# Altium PCB AVP32F08_EVM_Rev1.1.PcbDoc (part 2 of 2)
Units mm, origin at the board's own origin, x right, y up, seen from the top; angles counter-clockwise.
Board outline 120.23 x 75.25 mm, 4 copper layers (Top Layer, GND, S1, Bottom Layer), stack 2.642 mm thick; 139 components, 118 nets, 534 pads, 235 vias.
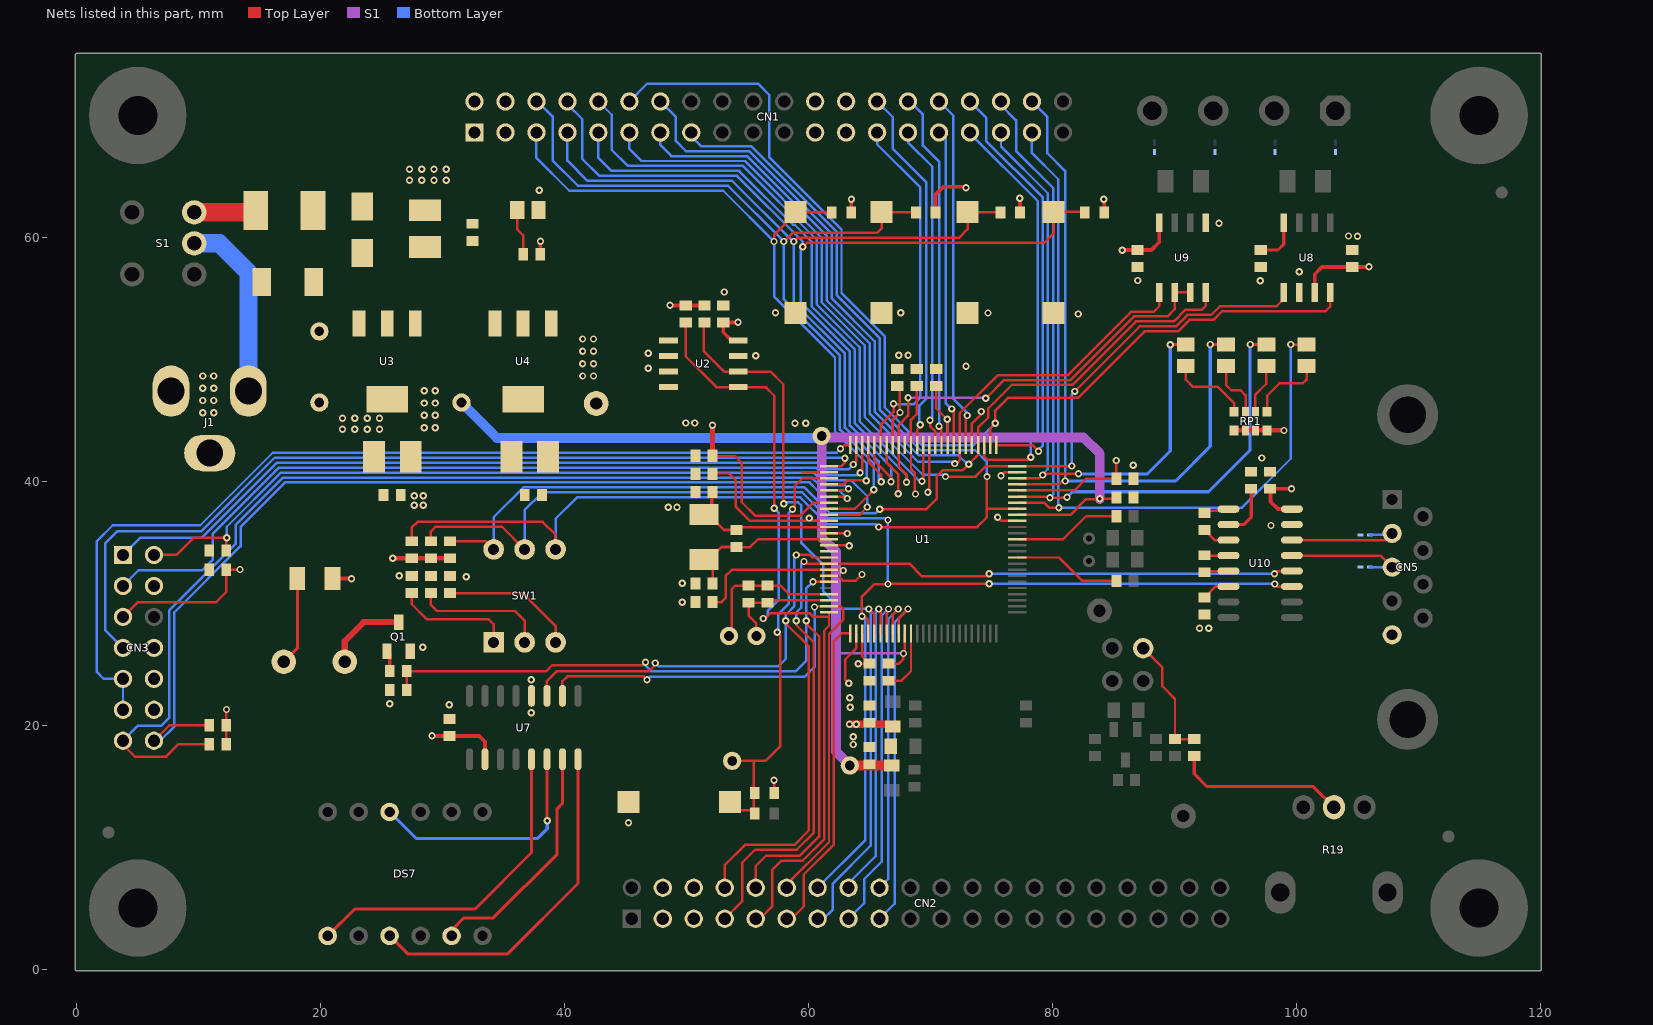
[diagram p4: the nets of this part, all layers, seen from the top]

## Via types
v1: diameter 0.6, hole 0.3, Top Layer to Bottom Layer, tented both sides, 235 vias

## Nets (pads, with @x,y where several pads share a name; then routed paths per layer and width w, separated by ;. In a path a pad name is that pad's centre, name@x,y a point inside that pad or via, vN(x,y) a via of type N, cw(c..) or ccw(c..) an arc to the next point about the centre after c; other vN are vias at no path point) (continued)
DGND: C1.2 C2.2 C3.1 C4.2 C7.2 C8.2 C9.2 C10.2 C11.2 C12.2 C13.2 C14.2 C16.2 C17.2 C18.2 C19.2 C20.2 C21.2 C22.2 C23.2 C30.2 C33.2 C39.2 C41.2 C42.2 C43.2 C44.2 C45.2 CN1.3 CN1.4 CN1.25 CN1.26 CN2.5 CN2.6 CN3.4 CN3.8 CN3.10 CN3.12 CN5.5 D2.1 DS2.2 J1.2 J1.3 K1.2 K2.2 K3.2 K4.2 K5.2 L3.1 Q1.S R4.1 R15.2 R23.1 R26.2 R27.2 R29.2 T1.2 T2.2 T3.2 T4.2 T5.2 T6.2 TP6.1 U1.2 U1.11 U1.41 U1.49 U1.55 U1.62 U1.69 U1.77 U1.87 U1.89 U1.94 U2.1 U2.2 U2.3 U2.4 U2.7 U3.1 U4.1 U7.4 U8.2 U9.5 U10.15 | length 32.8
  Top Layer w0.203: 59.53,40.749 U1.77@61.687,40.749 ; U1.94@61.687,32.249 62.442,32.249 62.84,31.852 63.881,31.852 v1(64.389,32.36) ; U1.89@61.687,34.749 63.32,34.749 v1(63.348,34.722) ; U1.87@61.687,35.749 63.158,35.749 v1(63.195,35.712) ; v1(63.297,23.444) 63.017,23.724 63.017,25.4 63.912,26.295 U1.2@63.912,27.524 ; U1.69@66.412,42.974 66.412,41.539 67.356,40.595 67.356,38.993 v1(67.361,38.989) ; C19.2@66.573,23.647 67.64,23.647 68.412,24.419 U1.11@68.412,27.524 ; v1(69.799,39.091) 69.912,39.204 U1.62@69.912,42.974 ; U1.55@73.412,42.974 73.412,44.736 74.168,45.491 v1(74.168,45.72) ; v1(75.514,37.059) 75.823,36.749 U1.41@77.137,36.749 ; v1(75.794,40.462) 76.081,40.749 U1.49@77.137,40.749
  other v1: 45.237,11.989 63.678,18.415 63.678,19.05 37.262,21.006 63.424,21.463 30.531,21.666 25.654,21.768 63.398,22.25 37.262,23.724 28.372,26.391 92.075,27.94 92.837,27.94 49.657,30.074 49.657,31.648 31.928,32.182 26.441,32.258 97.942,36.373 48.514,37.871 49.225,37.871 27.661,38.024 28.423,38.024 27.661,38.811 28.423,38.811 86.639,41.326 97.18,41.91 28.499,44.399 29.388,44.399 58.903,44.755 59.792,44.755 49.936,44.78 50.673,44.78 28.499,45.407 29.388,45.407 10.338,45.618 11.227,45.618 28.499,46.414 29.388,46.414 10.338,46.626 11.227,46.626 28.499,47.422 29.388,47.422 10.338,47.633 11.227,47.633 10.338,48.641 11.227,48.641 41.478,48.641 42.367,48.641 46.863,49.276 72.923,49.428 41.478,49.649 42.367,49.649 55.677,50.292 67.412,50.343 68.174,50.343 46.863,50.495 41.478,50.656 42.367,50.656 41.478,51.664 42.367,51.664 82.118,53.721 74.727,53.797 57.302,53.823 67.564,53.823 53.086,55.524 97.053,56.439 87.02,56.464 100.254,57.175 105.029,60.096 104.292,60.122 93.675,61.163 37.922,63.881 27.28,64.694 28.287,64.694 29.295,64.694 30.302,64.694 27.28,65.583 28.287,65.583 29.295,65.583 30.302,65.583
DP: DS7.dp U7.16 | length 28.6
  Top Layer w0.254: DS7.dp@25.654,2.718 27.127,1.245 35.331,1.245 41.097,7.01 U7.16@41.097,17.203
DSP_R\S\T\: C5.1 K1.1 R7.2 TP1.1 U1.78 | length 36.4
  Top Layer w0.203: K1.1@53.553,13.691 54.239,13.005 55.334,13.005 C5.1@55.588,12.751 55.499,12.84 R7.2@55.499,14.427 ; TP1.1@53.746,17.069 55.499,17.069 ; R7.2@55.588,14.427 R7.2@55.499,14.427 ; v1(57.455,27.61) 57.679,27.386 57.679,18.258 56.49,17.069 55.499,17.069 ; v1(58.699,37.719) 58.872,37.892 58.872,39.594 59.528,40.249 U1.78@61.687,40.249 ; R7.2@55.499,14.427 55.499,17.069
  Bottom Layer w0.203: v1(57.455,27.61) 57.531,27.686 57.531,29.108 58.395,29.972 58.395,37.414 v1(58.699,37.719)
DSP_RX_IN: CN5.3 T5.1 U10.13 | length 10.4
  Top Layer w0.203: U10.13@99.653,33.909 106.921,33.909 CN5.3@107.874,32.956
  Bottom Layer w0.203: T5.1@106.045,32.969 107.861,32.969 CN5.3@107.874,32.956
DSP_TX_OUT: CN5.2 T6.1 U10.14 | length 10.3
  Top Layer w0.203: U10.14@99.653,35.179 107.323,35.179 CN5.2@107.874,35.729
  Bottom Layer w0.203: T6.1@106.045,35.611 107.755,35.611 CN5.2@107.874,35.729
DVDD1V8: C16.1 C17.1 C18.1 C19.1 C20.1 C21.1 C22.1 C23.1 C33.1 L2.1 pad.2 TP4.1 U1.10 U1.42 U1.59 U1.68 U1.85 U1.93 U4.2 | length 148.6
  Top Layer w0.2: C19.1@66.573,25.047 67.415,25.047 67.793,25.425 v1(67.793,25.883)
  Top Layer w0.203: C23.1@52.07,40.594 52.116,40.64 53.492,40.64 54.026,40.107 54.026,37.948 55.224,36.749 59.838,36.749 v1(60.071,36.982) 60.304,36.749 U1.85@61.687,36.749 ; C20.1@52.135,30.099 52.883,30.099 53.213,30.429 53.213,32.233 53.73,32.749 U1.93@61.687,32.749 62.805,32.749 v1(62.865,32.69) ; U1.68@66.912,42.974 66.912,45.052 v1(67.508,45.648) 67.508,47.59 C22.1@67.285,47.814 ; v1(67.793,25.883) 67.912,26.002 U1.10@67.912,27.524 ; C21.1@70.485,47.814 70.485,45.974 v1(71.374,45.085) 71.412,45.047 U1.59@71.412,42.974 ; U1.42@77.137,37.249 81.496,37.249 82.779,38.532 83.871,38.532 v1(83.896,38.557) 85.153,38.557 C18.1@85.265,38.669
  Top Layer w0.8: pad.2@63.398,16.688 L2.1@66.853,16.688
  S1 w0.2: 62.256,25.883 v1(67.793,25.883)
  S1 w0.203: v1(60.071,36.982) 60.274,36.779 61.087,36.779 ; 62.256,32.715 62.282,32.69 v1(62.865,32.69) ; 66.929,43.601 66.929,45.069 v1(67.508,45.648) ; 71.374,43.601 v1(71.374,45.085)
  S1 w0.8: pad.2@63.398,16.688 62.256,17.83 62.256,25.883 62.256,32.715 62.256,34.238 61.087,35.408 61.087,36.779 pad.2@61.087,43.713 61.2,43.601 66.929,43.601 71.374,43.601 82.561,43.601 83.896,42.266 v1(83.896,38.557)
  Bottom Layer w0.8: TP4.1@31.547,46.457 34.442,43.561 60.655,43.561 pad.2@61.087,43.713
DVDD3V3: C1.1 C4.1 C7.1 C8.1 C11.1 C12.1 C13.1 C14.1 C30.1 C39.1 C41.1 C42.1 C43.1 CN1.1 CN1.2 CN1.23 CN1.24 CN2.3 CN2.4 CN3.5 L1.1 R1.2 R2.2 R5.1 R6.1 R7.1 R9.1 R12.1 R16.1 R17.1 R20.1 R21.1 R25.1 R28.1 R30.1 RP1.1 RP1.2 RP1.3 RP1.4 TP3.1 U1.3 U1.46 U1.65 U1.82 U2.8 U3.2 U7.10 U8.3 U9.8 U10.16 | length 106.9
  Top Layer w0.203: CN3.5@3.785,28.88 5.004,30.099 11.43,30.099 12.257,30.926 C4.1@12.257,32.741 13.36,32.741 v1(13.386,32.766) ; R5.1@12.257,18.44 R6.1@12.257,19.99 12.257,21.274 v1(12.268,21.285) ; C14.1@52.07,42.067 53.97,42.067 54.534,41.504 54.534,38.278 55.621,37.19 59.365,37.19 60.424,38.249 U1.82@61.687,38.249 ; v1(57.175,15.494) 57.188,15.481 R7.1@57.188,14.427 ; v1(64.084,25.044) 63.887,25.044 63.884,25.047 C12.1@64.999,25.047 64.412,25.634 U1.3@64.412,27.524 ; v1(68.783,38.964) 68.732,38.964 68.732,40.691 68.412,41.011 U1.65@68.412,42.974 68.407,42.98 68.407,45.039 68.885,45.517 C13.1@68.885,47.814 ; U1.46@77.137,39.249 81.82,39.249 82.779,40.208 C11.1@85.265,40.208 85.265,41.684 v1(85.242,41.707)
  Top Layer w0.305: R12.1@20.98,32.029 22.504,32.029 v1(22.53,32.004) ; v1(29.134,19.126) 29.148,19.112 C39.1@30.556,19.112 33.009,19.112 33.477,18.644 U7.10@33.477,17.203 ; R9.1@38.013,58.623 38.013,59.679 v1(38.024,59.69) ; v1(48.641,54.432) 48.652,54.421 R2.2@49.936,54.421 R1.2@51.473,54.421 ; v1(54.229,53.035) 54.215,53.021 C1.1@53.01,53.021 53.01,52.222 53.696,51.537 U2.8@54.242,51.537 ; R16.1@63.513,62.052 63.513,63.132 v1(63.525,63.144) ; R17.1@70.43,62.052 70.43,63.521 71.069,64.16 72.847,64.16 v1(72.923,64.084) ; v1(77.343,63.221) 77.347,63.216 R20.1@77.347,62.052 ; v1(84.226,63.119) 84.264,63.081 R21.1@84.264,62.052 ; v1(85.75,58.953) 85.765,58.968 C41.1@86.995,58.968 88.127,58.968 88.773,59.614 U9.8@88.773,61.201 ; C43.1@97.866,39.381 C43.1@97.892,39.381 ; v1(99.619,39.395) 99.604,39.381 C43.1@97.892,39.381 ; U10.16@99.653,37.719 98.501,37.719 97.892,38.328 C43.1@97.892,39.381 ; U8.3@101.524,55.486 101.524,56.972 102.119,57.568 C42.1@104.597,57.568 105.929,57.568 v1(105.969,57.607)
  Top Layer w0.381: v1(25.908,33.68) 25.913,33.685 R30.1@27.462,33.685 R25.1@30.612,33.685 ; C14.1@52.135,42.088 v1(52.135,44.591) ; RP1.1@94.912,44.173 99.007,44.173 v1(99.009,44.171)
  Top Layer w0.6: v1(63.373,20.066) 66.675,20.066 66.7,20.091 L1.1@66.904,19.888
  other v1: 63.932,20.066 21.793,44.272 22.801,44.272 23.808,44.272 24.816,44.272 21.793,45.161 22.801,45.161 23.808,45.161 24.816,45.161
E: DS7.e U7.13 | length 27.2
  Top Layer w0.254: DS7.e@20.574,2.718 22.784,4.928 32.664,4.928 37.287,9.55 U7.13@37.287,17.203
EMU0: CN3.13 R5.2 U1.80 | length 84.8
  Top Layer w0.203: CN3.13@3.785,18.72 3.785,18.39 4.75,17.424 7.315,17.424 8.331,18.44 R5.2@10.857,18.44 ; U1.80@61.687,39.249 63.152,39.249 v1(63.288,39.386)
  Bottom Layer w0.203: CN3.13@3.785,18.72 5.029,19.964 6.934,19.964 7.595,20.625 7.595,29.439 13.021,34.865 13.021,36.424 16.907,40.31 60.258,40.31 60.893,39.675 62.999,39.675 v1(63.288,39.386)
EMU1: CN3.14 R6.2 U1.81 | length 79.2
  Top Layer w0.203: CN3.14@6.325,18.72 7.595,19.99 R6.2@10.857,19.99 ; U1.81@61.687,38.749 63.028,38.749 v1(63.195,38.583)
  Bottom Layer w0.203: CN3.14@6.325,18.72 6.833,18.72 8.001,19.888 8.001,29.261 13.427,34.687 13.427,36.255 17.075,39.903 60.09,39.903 60.725,39.268 62.509,39.268 v1(63.195,38.583)
EPWM1A/LED2: CN1.38 DS4.2 U1.47 | length 59
  Top Layer w0.203: U1.47@77.137,39.749 80.542,39.749 80.823,40.03 v1(81.051,40.03)
  Top Layer w0.254: v1(92.954,51.225) 92.968,51.211 DS4.2@94.249,51.211
  Bottom Layer w0.203: CN1.38@78.334,71.152 79.604,69.882 79.604,66.904 81.051,65.456 v1(81.051,40.03)
  Bottom Layer w0.254: v1(81.051,40.03) 90.119,40.03 92.954,42.865 v1(92.954,51.225)
EPWM1B/LED4: CN1.37 DS6.2 U1.44 | length 66.7
  Top Layer w0.203: U1.44@77.137,38.249 79.327,38.249 79.756,37.821 v1(80.543,37.821) ; v1(99.558,51.225) 99.572,51.211 DS6.2@100.853,51.211
  Bottom Layer w0.203: CN1.37@78.334,68.612 78.334,66.929 80.493,64.77 80.493,37.871 v1(80.543,37.821) 95.529,37.821 99.558,41.849 v1(99.558,51.225)
EPWM2A/LED3: CN1.36 DS5.2 U1.45 | length 65.1
  Top Layer w0.203: U1.45@77.137,38.749 79.716,38.749 v1(79.807,38.659) 81.178,38.659 v1(81.204,38.684)
  Top Layer w0.254: v1(96.23,51.225) 96.244,51.211 DS5.2@97.551,51.211
  Bottom Layer w0.203: CN1.36@75.794,71.152 75.794,70.841 77.038,69.596 77.038,67.081 80.086,64.033 80.086,38.938 v1(79.807,38.659)
  Bottom Layer w0.254: v1(81.204,38.684) 81.661,39.141 92.812,39.141 96.23,42.56 v1(96.23,51.225)
EPWM2B/LED1: CN1.35 DS3.2 U1.48 | length 53.3
  Top Layer w0.203: U1.48@77.137,40.249 78.959,40.249 v1(79.223,40.513) 79.324,40.615 v1(82.144,40.615)
  Top Layer w0.254: v1(89.677,51.199) 89.689,51.211 DS3.2@90.947,51.211
  Bottom Layer w0.203: CN1.35@75.794,68.612 75.794,67.462 79.629,63.627 79.629,40.986 79.223,40.58 v1(79.223,40.513)
  Bottom Layer w0.254: v1(82.144,40.615) 87.808,40.615 89.677,42.484 v1(89.677,51.199)
EPWM3A: CN1.34 U1.51 | length 35
  Top Layer w0.203: U1.51@75.412,42.974 78.361,42.974 v1(78.867,42.469)
  Bottom Layer w0.203: CN1.34@73.254,71.152 74.574,69.831 74.574,67.92 79.223,63.271 79.223,42.951 78.867,42.596 v1(78.867,42.469)
EPWM3B: CN1.33 U1.53 | length 34.1
  Top Layer w0.203: U1.53@74.412,42.974 74.412,42.047 74.676,41.783 78.054,41.783 v1(78.232,41.961)
  Bottom Layer w0.203: CN1.33@73.254,68.612 73.254,68.529 78.816,62.967 78.816,43.79 78.232,43.205 v1(78.232,41.961)
EPWM4A: CN1.32 U1.56 | length 29.2
  Top Layer w0.203: U1.56@72.912,42.974 72.912,45.277 v1(73.032,45.397)
  Bottom Layer w0.203: CN1.32@70.714,71.152 71.882,69.984 71.882,46.761 73.032,45.611 v1(73.032,45.397)
EPWM4B: CN1.31 U1.58 | length 26.1
  Top Layer w0.203: v1(71.742,45.936) 71.912,45.766 U1.58@71.912,42.974
  Bottom Layer w0.203: CN1.31@70.714,68.612 71.247,68.079 71.247,46.431 v1(71.742,45.936)
EPWM5A: CN1.30 U1.60 | length 29.5
  Top Layer w0.203: v1(70.714,44.526) 70.806,44.526 70.912,44.42 U1.60@70.912,42.974
  Bottom Layer w0.203: CN1.30@68.174,71.152 68.319,71.152 69.393,70.079 69.393,67.539 70.714,66.218 v1(70.714,44.526)
EPWM5B: CN1.29 U1.61 | length 26.7
  Top Layer w0.203: v1(69.977,45.009) 69.977,44.515 70.412,44.08 U1.61@70.412,42.974
  Bottom Layer w0.203: CN1.29@68.174,68.612 68.174,67.793 70.155,65.811 70.155,45.187 v1(69.977,45.009)
EPWM6A: CN1.28 U1.64 | length 30.6
  Top Layer w0.203: U1.64@68.912,42.974 68.912,44.223 69.164,44.475 v1(69.164,44.628)
  Bottom Layer w0.203: CN1.28@65.634,71.152 66.929,69.857 66.929,67.259 69.647,64.541 69.647,46.761 69.109,46.223 69.109,44.42 69.164,44.475 v1(69.164,44.628)
EPWM6B: CN1.27 U1.70 | length 29.5
  Top Layer w0.203: U1.70@65.912,42.974 65.912,44.627 66.98,45.695 v1(66.98,46.355)
  Bottom Layer w0.203: CN1.27@65.634,68.612 65.634,67.64 69.19,64.084 69.19,46.879 68.645,46.334 67,46.334 v1(66.98,46.355)
F: DS7.f U7.14 | length 19.9
  Top Layer w0.254: U7.14@38.557,17.203 38.557,12.192 v1(38.583,12.167)
  Bottom Layer w0.254: DS7.f@25.654,12.878 27.813,10.719 37.795,10.719 38.583,11.506 v1(38.583,12.167)
G: DS7.g U7.15 | length 19.7
  Top Layer w0.254: DS7.g@30.734,2.718 30.734,3.175 31.75,4.191 34.163,4.191 39.395,9.423 39.395,13.157 39.827,13.589 U7.15@39.827,17.203
GPIO12: CN2.11 U1.1 | length 26.2
  Top Layer w0.203: CN2.11@58.217,4.122 58.605,4.122 59.614,5.131 59.614,7.747 62.094,10.227 62.094,26.889 62.729,27.524 U1.1@63.412,27.524
GPIO13/EN_BUZZER: CN2.10 R14.2 R15.1 U1.95 | length 69.5
  Top Layer w0.203: R15.1@27.065,22.885 R14.2@27.065,24.435 38.506,24.435 38.989,24.917 46.406,24.917 v1(46.634,25.146) ; CN2.10@55.677,6.662 55.677,8.433 56.54,9.296 59.309,9.296 60.874,10.862 60.874,27.289 59.817,28.346 v1(59.817,28.55) ; v1(60.376,31.75) U1.95@61.687,31.749
  Bottom Layer w0.203: v1(46.634,25.146) 46.634,24.892 47.117,24.409 58.953,24.409 59.817,25.273 v1(59.817,28.55) 59.817,31.191 v1(60.376,31.75)
GPIO14: CN2.18 U1.8 | length 25.7
  Top Layer w0.203: U1.8@66.912,27.524 66.912,29.077 v1(67.367,29.531)
  Bottom Layer w0.203: CN2.18@65.837,6.662 66.548,7.374 66.548,28.712 v1(67.367,29.531)
GPIO15: CN2.17 U1.9 | length 28.7
  Top Layer w0.203: U1.9@67.412,27.524 67.412,28.773 v1(68.17,29.531)
  Bottom Layer w0.203: CN2.17@65.837,4.122 67.081,5.367 67.081,28.423 67.071,28.433 v1(68.17,29.531)
GPIO16/CANTXB: CN1.11 U1.50 U8.1 | length 82.7
  Top Layer w0.203: v1(71.247,40.386) 73.711,40.386 74.574,41.249 U1.50@77.137,41.249 v1(81.585,41.25) ; v1(81.839,47.371) 87.173,52.705 90.135,52.705 91.075,53.645 93.04,53.645 93.751,54.356 98.4,54.356 98.984,54.94 U8.1@98.984,55.486
  Bottom Layer w0.203: CN1.11@45.314,68.612 45.314,67.259 46.304,66.269 54.794,66.269 61.087,59.976 61.087,54.68 64.618,51.15 64.618,45.288 69.372,40.534 71.099,40.534 v1(71.247,40.386) ; v1(81.585,41.25) 81.585,47.117 v1(81.839,47.371)
GPIO17/CANRXB: CN1.12 U1.52 U8.4 | length 88.3
  Top Layer w0.203: U1.52@74.912,42.974 74.912,44.356 v1(75.311,44.755) 75.311,45.745 75.298,45.758 76.378,46.838 82.093,46.838 87.554,52.299 90.303,52.299 91.243,53.238 93.209,53.238 93.92,53.95 102.413,53.95 102.794,54.331 U8.4@102.794,55.486
  Bottom Layer w0.203: CN1.12@45.314,71.152 46.78,72.619 55.855,72.619 56.769,71.704 56.769,66.593 62.713,60.649 62.713,55.439 66.243,51.908 66.243,46.073 69.364,42.951 73.508,42.951 v1(75.311,44.755)
GPIO18/SCITXB: CN1.14 R25.2 SW1.6 U1.54 U9.4 | length 123
  Top Layer w0.203: R25.2@30.612,35.085 33.52,35.085 SW1.6@34.188,34.417 ; v1(65.862,37.719) 69.672,37.719 70.536,38.583 70.536,40.422 71.033,40.919 72.669,40.919 v1(73.152,41.402) 73.912,42.162 U1.54@73.912,42.974 73.912,44.399 74.752,45.239 74.752,45.974 76.678,47.9 81.647,47.9 86.859,53.111 89.967,53.111 90.932,54.077 92.278,54.077 92.583,54.381 U9.4@92.583,55.486
  Bottom Layer w0.203: SW1.6@34.188,34.417 34.188,37.059 36.627,39.497 59.665,39.497 61.793,37.368 65.511,37.368 v1(65.862,37.719) ; CN1.14@47.854,71.152 49.124,69.882 49.124,67.894 49.936,67.081 55.131,67.081 61.9,60.313 61.9,55.017 65.43,51.486 65.43,45.736 69.028,42.139 72.288,42.139 73.025,41.402 v1(73.152,41.402)
GPIO19/SCIRXB: CN1.13 U1.57 U9.1 | length 68
  Top Layer w0.203: v1(72.009,41.453) 72.155,41.453 72.412,41.71 U1.57@72.412,42.974 72.412,45.59 75.535,48.712 81.301,48.712 86.512,53.924 88.341,53.924 88.773,54.356 U9.1@88.773,55.486
  Bottom Layer w0.203: CN1.13@47.854,68.612 47.854,67.589 48.768,66.675 54.963,66.675 61.493,60.144 61.493,54.849 65.024,51.318 65.024,45.568 68.991,41.6 71.861,41.6 v1(72.009,41.453)
GPIO20: CN1.10 U1.63 | length 50.8
  Top Layer w0.203: v1(69.317,40.005) 69.412,40.101 U1.63@69.412,42.974
  Bottom Layer w0.203: CN1.10@42.774,71.152 43.866,70.06 43.866,67.183 45.187,65.862 54.626,65.862 60.681,59.808 60.681,54.512 64.211,50.981 64.211,44.911 66.98,42.142 66.98,42.139 69.113,40.005 v1(69.317,40.005)
GPIO21: CN1.9 U1.67 U9.2 U9.3 | length 80.4
  Top Layer w0.203: v1(68.047,39.929) 68.047,40.548 67.412,41.182 U1.67@67.412,42.974 67.412,44.619 68.174,45.38 v1(68.174,46.863) ; v1(74.549,46.812) 76.043,48.306 81.478,48.306 86.69,53.518 89.433,53.518 90.043,54.127 U9.2@90.043,55.486 U9.3@91.313,55.486
  S1 w0.203: v1(68.174,46.863) 74.498,46.863 v1(74.549,46.812)
  Bottom Layer w0.203: CN1.9@42.774,68.612 42.774,66.523 43.84,65.456 54.316,65.456 58.736,61.036 58.877,61.036 60.274,59.639 60.274,54.344 63.805,50.813 63.805,44.742 66.573,41.974 66.573,41.97 68.047,40.497 v1(68.047,39.929)
GPIO22: CN1.8 K5.1 R21.2 U1.71 | length 77.9
  Top Layer w0.203: v1(59.538,59.233) 59.868,59.563 79.35,59.563 80.112,60.325 K5.1@80.112,62.087 82.629,62.087 R21.2@82.664,62.052 ; U1.71@65.412,42.974 65.412,41.665 66.777,40.3 v1(66.777,39.954)
  Bottom Layer w0.203: CN1.8@40.234,71.152 40.234,70.917 41.453,69.698 41.453,66.446 42.85,65.049 54.148,65.049 59.538,59.66 v1(59.538,59.233) 59.385,59.08 59.385,54.658 63.398,50.645 63.398,44.574 66.167,41.805 66.167,41.802 66.777,41.192 v1(66.777,39.954)
GPIO23: CN1.7 K4.1 R20.2 U1.72 | length 68.6
  Top Layer w0.203: v1(58.785,59.665) 59.09,59.969 72.339,59.969 73.059,60.689 K4.1@73.059,62.087 73.094,62.052 R20.2@75.747,62.052 ; U1.72@64.912,42.974 64.912,41.59 65.964,40.538 v1(65.964,39.954)
  Bottom Layer w0.203: CN1.7@40.234,68.612 40.234,66.294 41.885,64.643 53.751,64.643 58.73,59.665 v1(58.785,59.665) 58.785,54.683 62.992,50.476 62.992,44.406 65.761,41.637 65.761,40.157 v1(65.964,39.954)
GPIO24: CN1.6 K3.1 R17.2 U1.83 | length 67.5
  Top Layer w0.203: v1(57.982,59.665) 58.693,60.376 65.634,60.376 66.006,60.748 K3.1@66.006,62.087 66.041,62.052 R17.2@68.83,62.052 ; U1.83@61.687,37.749 63.81,37.749 v1(65.354,39.294)
  Bottom Layer w0.203: CN1.6@37.694,71.152 37.795,71.152 39.014,69.933 39.014,66.319 41.097,64.237 53.41,64.237 v1(57.982,59.665) 57.982,54.912 62.586,50.308 62.586,44.237 65.354,41.469 v1(65.354,39.294)
GPIO25/DAT: CN2.8 U1.91 U7.3 | length 61.4
  Top Layer w0.203: U7.3@38.557,22.403 38.557,23.622 39.37,24.435 46.925,24.435 47.447,24.957 v1(47.447,25.095) ; CN2.8@53.137,6.662 53.137,8.534 54.788,10.185 58.852,10.185 60.046,11.379 60.046,26.441 58.141,28.346 v1(58.141,28.55) ; v1(59.004,33.96) 60.122,33.96 60.332,33.749 U1.91@61.687,33.749
  Bottom Layer w0.203: v1(47.447,25.095) 47.701,24.841 57.556,24.841 58.141,25.425 v1(58.141,28.55) 58.141,29.058 58.852,29.769 58.852,33.807 v1(59.004,33.96)
GPIO26/CLK: CN2.12 U1.99 U7.2 | length 54.7
  Top Layer w0.203: U7.2@39.827,22.403 39.827,23.597 40.234,24.003 46.482,24.003 v1(46.761,23.724) ; CN2.12@58.217,6.662 58.217,6.925 61.687,10.395 61.687,27.473 62.84,28.626 62.84,29.54 62.63,29.749 U1.99@61.687,29.749 60.56,29.749 v1(60.503,29.693)
  Bottom Layer w0.203: v1(46.761,23.724) 46.99,23.952 59.665,23.952 60.503,24.79 v1(60.503,29.693)
GPIO27: CN1.5 K2.1 R16.2 U1.79 | length 56.5
  Top Layer w0.203: v1(57.179,59.665) 57.179,60.201 58.953,61.976 K2.1@58.953,62.087 58.989,62.052 R16.2@61.913,62.052 ; U1.79@61.687,39.749 62.889,39.749 63.221,40.081 64.719,40.081 v1(64.745,40.056)
  Bottom Layer w0.203: CN1.5@37.694,68.612 37.694,66.523 40.386,63.83 53.013,63.83 v1(57.179,59.665) 57.179,55.14 62.179,50.14 62.179,44.069 64.765,41.483 64.765,40.076 v1(64.745,40.056)
GPIO28/SCIRXA: CN2.7 U1.92 U10.12 | length 75.9
  Top Layer w0.203: CN2.7@53.137,4.122 54.559,5.545 54.559,8.712 55.626,9.779 59.03,9.779 60.452,11.201 60.452,26.772 59.004,28.219 v1(59.004,28.55) ; v1(59.639,33.426) 59.816,33.249 U1.92@61.687,33.249 68.274,33.249 69.317,32.207 74.63,32.207 v1(74.828,32.406) ; v1(98.222,32.41) 98.45,32.639 U10.12@99.653,32.639
  Bottom Layer w0.203: v1(59.004,28.55) 59.004,29.235 59.411,29.642 59.411,33.249 59.588,33.426 v1(59.639,33.426) ; v1(74.828,32.406) 98.217,32.406 v1(98.222,32.41)
GPIO29/SCITXA: CN2.14 R28.2 SW1.5 U1.4 U10.11 | length 112.4
  Top Layer w0.203: R28.2@29.037,35.085 29.037,35.895 29.413,36.271 34.874,36.271 SW1.5@36.728,34.417 ; U1.4@64.912,27.524 64.912,28.636 64.618,28.931 v1(64.389,28.931) 64.389,30.556 65.405,31.572 v1(66.523,31.572) 66.553,31.602 v1(74.828,31.602) ; v1(98.247,31.572) 98.45,31.369 U10.11@99.653,31.369
  Bottom Layer w0.203: SW1.5@36.728,34.417 36.728,37.643 38.176,39.091 59.496,39.091 61.625,36.962 66.391,36.962 v1(66.523,36.83) v1(66.523,31.572) ; CN2.14@60.757,6.662 64.668,10.574 64.668,28.651 v1(64.389,28.931) ; v1(74.828,31.602) v1@98.039,31.602 ; v1@98.044,31.598 98.222,31.598 v1(98.247,31.572)
GPIO30: CN2.16 U1.6 | length 26
  Top Layer w0.203: v1(65.761,29.531) 65.912,29.38 U1.6@65.912,27.524
  Bottom Layer w0.203: CN2.16@63.297,6.662 63.297,7.036 65.507,9.246 65.507,29.277 v1(65.761,29.531)
GPIO31: CN2.15 U1.7 | length 28.8
  Top Layer w0.203: U1.7@66.412,27.524 66.412,29.38 v1(66.564,29.531)
  Bottom Layer w0.203: CN2.15@63.297,4.122 64.567,5.392 64.567,7.358 66.015,8.805 66.015,28.982 v1(66.564,29.531)
GPIO32/SDAA: CN2.9 R2.1 U1.100 U2.5 | length 64.9
  Top Layer w0.203: R2.1@49.936,53.021 49.936,50.241 52.451,47.727 U2.5@54.242,47.727 56.49,47.727 57.201,47.015 v1(57.201,37.795) ; CN2.9@55.677,4.122 56.015,4.122 57.048,5.156 57.048,8.153 57.785,8.89 59.538,8.89 61.281,10.633 61.281,27.746 61.687,28.153 61.687,28.88 ; v1(56.286,28.753) 56.457,28.753 56.868,29.164 60.141,29.164 60.425,28.88 61.687,28.88 ; U1.100@61.687,29.249 61.687,28.88
  Bottom Layer w0.203: v1(56.286,28.753) 56.413,28.753 56.672,29.012 56.672,29.399 57.582,30.309 57.582,37.414 v1(57.201,37.795)
GPIO33/SCLA: CN2.13 R1.1 U1.5 U2.6 | length 63.3
  Top Layer w0.203: R1.1@51.41,53.021 51.41,50.673 53.086,48.997 U2.6@54.242,48.997 56.896,48.997 57.937,47.955 57.937,38.202 v1(57.988,38.151) ; v1(64.957,29.531) 65.412,29.077 U1.5@65.412,27.524
  Bottom Layer w0.203: v1(57.988,38.151) 58.115,38.278 59.16,38.278 59.43,38.007 59.43,34.931 61.227,33.134 61.227,30.975 62.671,29.531 v1(64.957,29.531) 65.1,29.389 65.1,10.109 61.976,6.985 61.976,4.851 61.247,4.122 CN2.13@60.757,4.122
GPIO34: CN1.15 R30.2 SW1.4 U1.43 | length 103.9
  Top Layer w0.203: R30.2@27.462,35.085 27.462,36.2 27.94,36.678 38.202,36.678 39.243,35.636 39.243,34.442 SW1.4@39.268,34.417 ; v1(65.761,36.246) 73.838,36.246 74.641,37.049 74.641,37.694 ; v1(74.641,40.386) 74.641,37.694 ; U1.43@77.137,37.749 74.697,37.749 74.641,37.694
  Bottom Layer w0.203: SW1.4@39.268,34.417 39.268,36.932 41.021,38.684 59.328,38.684 61.519,36.493 65.513,36.493 v1(65.761,36.246) ; CN1.15@50.394,68.612 50.394,68.275 51.181,67.488 55.299,67.488 62.306,60.481 62.306,55.27 65.837,51.74 65.837,45.904 69.196,42.545 73.685,42.545 74.641,41.589 v1(74.641,40.386)
NetC40_1: C40.1 JP2.1 R18.2 | length 10.1
  Top Layer w0.203: JP2.1@87.452,26.314 89.027,24.74 89.027,23.19 90.063,22.154 C40.1@90.063,18.861 R18.2@91.643,18.861
NetC46_1: C46.1 U10.1 | length 2.1
  Top Layer w0.203: C46.1@92.481,37.403 92.645,37.567 94.301,37.567 U10.1@94.453,37.719
NetC46_2: C46.2 U10.3 | length 2.3
  Top Layer w0.203: C46.2@92.481,36.003 93.305,35.179 U10.3@94.453,35.179
NetC47_1: C47.1 U10.4 | length 2
  Top Layer w0.203: C47.1@92.486,33.936 92.513,33.909 U10.4@94.453,33.909
NetC47_2: C47.2 U10.5 | length 2
  Top Layer w0.203: C47.2@92.486,32.536 92.59,32.639 U10.5@94.453,32.639
NetC48_1: C48.1 C49.1 TP11.1 U1.97 | length 12.3
  Top Layer w0.203: TP11.1@53.483,27.314 53.721,27.552 53.721,31.166 54,31.445 C48.1@55.093,31.445 C49.1@56.642,31.445 57.709,31.445 58.405,30.749 U1.97@61.687,30.749
NetC48_2: C48.2 C49.2 TP12.1 U1.98 | length 9.7
  Top Layer w0.203: TP12.1@55.737,27.314 55.737,28.337 55.093,28.981 C48.2@55.093,30.045 C49.2@56.642,30.045 56.846,30.249 U1.98@61.687,30.249
NetD1_1: D1.1 F1.2
NetDS2_1: DS2.1 R9.2 | length 3.8
  Top Layer w0.203: DS2.1@36.121,62.255 36.121,60.653 36.613,60.161 R9.2@36.613,58.623
NetDS3_1: DS3.1 RP1.8 | length 6.6
  Top Layer w0.203: DS3.1@90.947,49.461 90.947,48.336 91.513,47.77 93.563,47.77 94.912,46.422 RP1.8@94.912,45.713
NetDS4_1: DS4.1 RP1.7 | length 4.9
  Top Layer w0.203: DS4.1@94.249,49.461 94.249,47.897 94.681,47.466 95.443,47.466 95.862,47.046 RP1.7@95.862,45.713
NetDS5_1: DS5.1 RP1.6 | length 4.1
  Top Layer w0.203: RP1.6@96.662,45.713 96.662,47.11 97.551,47.999 DS5.1@97.551,49.461
NetDS6_1: DS6.1 RP1.5 | length 6.2
  Top Layer w0.203: RP1.5@97.612,45.713 97.612,47.019 98.618,48.024 100.542,48.024 100.853,48.336 DS6.1@100.853,49.461
NetF1_1: F1.1 S1.3 | length 5.1
  Top Layer w1.524: S1.3@9.627,62.052 14.516,62.052 F1.1@14.668,62.205
NetQ1_D: Q1.D U5.2 | length 6.8
  Top Layer w0.508: U5.2@21.971,25.197 21.971,26.899 23.527,28.454 Q1.D@26.391,28.454
NetQ1_G: Q1.G R14.1 | length 1.6
  Top Layer w0.305: Q1.G@25.441,26.054 25.665,25.83 R14.1@25.665,24.536
NetR10_2: R10.2 U1.35 | length 8.9
  Top Layer w0.203: U1.35@77.137,33.749 80.551,33.749 82.474,31.826 R10.2@85.265,31.826
NetR11_2: R11.2 U1.38 | length 8.9
  Top Layer w0.203: U1.38@77.137,35.249 80.893,35.249 82.779,37.135 R11.2@85.265,37.135
NetR12_2: R12.2 U5.1 | length 7.3
  Top Layer w0.254: U5.1@16.971,25.197 18.08,26.306 R12.2@18.08,32.029
NetR18_1: R18.1 R19.2 | length 14
  Top Layer w0.254: R18.1@91.643,17.461 91.643,16.002 92.685,14.961 101.412,14.961 R19.2@103.099,13.274
NetR23_2: R23.2 U8.8 | length 3.8
  Top Layer w0.254: R23.2@97.104,58.968 98.515,58.968 98.984,59.436 U8.8@98.984,61.201
NetR26_1: R26.1 SW1.1 | length 9.8
  Top Layer w0.203: R26.1@27.464,30.834 27.464,29.915 28.702,28.677 33.782,28.677 34.188,28.27 SW1.1@34.188,26.797
NetR27_1: R27.1 SW1.2 | length 11
  Top Layer w0.203: R27.1@29.039,30.834 29.039,29.864 29.54,29.362 35.941,29.362 36.728,28.575 SW1.2@36.728,26.797
NetR29_1: R29.1 SW1.3 | length 11.1
  Top Layer w0.203: R29.1@30.614,30.834 36.552,30.834 39.268,28.118 SW1.3@39.268,26.797
T\R\S\T\: CN3.2 R4.2 U1.84 | length 68
  Top Layer w0.203: CN3.2@6.325,33.96 8.179,33.96 9.576,35.357 12.22,35.357 12.257,35.32 R4.2@12.257,34.315 ; U1.84@61.687,37.249 64.173,37.249 v1(64.821,37.897)
  Bottom Layer w0.203: CN3.2@6.325,33.96 CN3.2@6.375,33.909 ; v1(12.294,35.357) 12.294,36.271 16.739,40.716 60.427,40.716 61.062,40.081 63.515,40.081 64.821,38.775 v1(64.821,37.897)
TCK: CN3.9 CN3.11 U1.75 | length 80.7
  Top Layer w0.203: v1(62.636,42.672) 62.939,42.974 U1.75@63.412,42.974
  Bottom Layer w0.203: CN3.11@3.785,21.26 CN3.9@3.785,23.8 2.21,23.8 1.626,24.384 1.626,35.077 2.946,36.398 10.122,36.398 16.065,42.342 62.306,42.342 v1(62.636,42.672)
TDI: CN3.3 U1.73 | length 68.4
  Top Layer w0.203: v1(64.237,40.691) 64.412,40.866 U1.73@64.412,42.974
  Bottom Layer w0.203: CN3.3@3.785,31.42 5.08,32.715 10.296,32.715 11.157,33.576 11.157,35.709 16.57,41.123 60.63,41.123 61.265,40.488 64.033,40.488 v1(64.237,40.691)
TDO: CN3.7 U1.76 | length 74.6
  Top Layer w0.203: U1.76@61.687,41.249 62.712,41.249 62.992,41.529 v1(62.992,41.885)
  Bottom Layer w0.203: CN3.7@3.785,26.34 2.311,27.813 2.311,34.9 3.327,35.916 10.214,35.916 16.234,41.935 62.941,41.935 v1(62.992,41.885)
TMS: CN3.1 U1.74 | length 65.1
  Top Layer w0.203: v1(63.678,41.377) 63.912,41.611 U1.74@63.912,42.974
  Bottom Layer w0.203: CN3.1@3.785,33.96 5.207,35.382 10.255,35.382 16.402,41.529 60.858,41.529 61.417,40.97 63.271,40.97 v1(63.678,41.377)
V+: C44.1 U10.2 | length 4.4
  Top Layer w0.254: U10.2@94.453,36.449 95.707,36.449 96.317,37.059 C44.1@96.317,39.381
V-: C45.1 U10.6 | length 2.3
  Top Layer w0.254: C45.1@92.481,30.469 93.382,31.369 U10.6@94.453,31.369
VIN: C9.1 C10.1 D1.2 D2.2 TP2.1 U3.3 U4.3
VIN+: J1.1 S1.2 | length 15.2
  Bottom Layer w1.5: S1.2@9.627,59.512 11.684,59.512 14.072,57.125 J1.1@14.072,47.396
X1: C2.1 R3.1 U1.88 X1.2 | length 12.5
  Top Layer w0.203: X1.2@52.045,33.782 52.135,33.692 C2.1@52.135,31.623 ; R3.1@54.102,34.606 54.113,34.595 55.22,34.595 55.874,35.249 U1.88@61.687,35.249
  Top Layer w0.254: X1.2@52.045,33.782 52.869,34.606 R3.1@54.102,34.606
X2: C3.2 R3.2 U1.86 X1.1 | length 13
  Top Layer w0.203: R3.2@54.102,36.006 54.345,36.249 58.695,36.249 U1.86@61.687,36.249
  Top Layer w0.254: C3.2@52.07,39.116 52.07,37.918 X1.1@51.435,37.283 51.795,37.283 53.072,36.006 R3.2@54.102,36.006
XCLIN: U1.90
XCLKOUT: U1.66
pads on no net: C5.2 CN1.16 CN1.17 CN1.18 CN1.19 CN1.20 CN1.21 CN1.22 CN1.39 CN1.40 CN2.1 CN2.2 CN2.19 CN2.20 CN3.6 CN5.0 CN5.1 CN5.4 CN5.6 CN5.7 CN5.8 CN5.9 H1.1 H2.0 H3.1 H4.0 H5.1 H6.0 H7.1 H8.0 M1.0 M2.0 M3.0 R19.0 S1.0 S1.1 U8.5 U10.7 U10.8 U10.9 U10.10

## Polygon pours and split planes (outlines as drawn)
DGND on Top Layer "1" (solid, remove dead copper, pour order 22): -0.126,0.025 -0.126,74.981 cw(c-0.025,74.981) -0.096,75.052 -0.077,75.071 cw(c-0.006,75) -0.006,75.1 120,75.1 cw(c120,75) 120.1,75 cw(c120,75) 120.09,74.956 120.09,-0.051 cw(c119.99,-0.051) 119.99,-0.151 -0.025,-0.151 cw(c-0.025,-0.051) -0.118,-0.013 cw(c-0.025,0.025)
AGND on Top Layer "1" (solid, remove dead copper, pour order 18): 67.793,31.979 72.136,36.322 72.219,36.24 89.275,36.24 89.275,23.603 97.384,15.494 119.786,15.494 119.812,15.469 119.812,-0.051 67.793,-0.051
DVDD1V8 on Top Layer "1" (solid, remove dead copper, pour order 6): 35.738,51.333 35.738,54.483 37.821,54.483 37.821,44.958 37.135,44.272 37.135,37.236 37.109,37.211 31.445,37.211 30.353,38.303 30.353,49.098 31.928,50.673 35.077,50.673
DVDD3V3 on Top Layer "1" (solid, remove dead copper, pour order 4): 24.917,54.915 26.441,54.915 26.441,49.962 27.508,48.895 27.508,44.983 26.238,44.983 25.629,44.374 25.629,37.033 20.549,37.033 18.491,39.091 18.491,48.108 20.345,49.962 24.384,49.962 24.917,50.495
VIN on Top Layer "1" (solid, remove dead copper, pour order 2): 18.466,54.508 18.466,60.046 18.675,60.255 35.02,60.255 35.02,51.283 32.944,51.283 31.572,52.654 31.572,54.813 30.886,55.499 24.816,55.499 24.155,54.839 24.155,50.648 18.466,50.648
NetD1_1 on Top Layer "1" (solid, remove dead copper, pour order 0): 18.339,60.96 18.364,60.985 25.679,60.985 25.679,65.329 25.654,65.354 25.629,65.329 18.263,65.329 18.263,60.935 18.313,60.884
2.5VREF on Top Layer "1" (solid, remove dead copper, pour order 12): 86.208,24.74 86.208,20.041 83.21,20.041 82.855,19.685 82.855,18.339 89.052,18.339 89.052,24.74
AVDD3V3 on Top Layer "1" (solid, remove dead copper, pour order 14): 66.243,21.107 69.469,21.107 69.469,23.571 68.809,24.232 67.716,24.232 67.539,24.054 67.539,23.063 67.132,22.657 66.243,22.657
AVDD3V3 on S1 "1" (solid, remove dead copper, pour order 16): 67.793,-0.33 67.793,32.868 71.653,36.728 89.281,36.728 89.281,23.597 97.384,15.494 97.384,15.418 119.862,15.418 119.939,15.494 119.99,15.443 119.99,-0.33
DVDD3V3 on S1 "1" (solid, remove dead copper, pour order 10): 66.65,-0.203 66.65,33.071 71.044,37.465 88.316,37.465 89.84,35.941 89.84,23.292 97.485,15.646 119.939,15.646 119.939,75.159 119.881,75.1 -0.006,75.1 -0.006,-0.132 -0.025,-0.151 0.027,-0.203
DGND on Bottom Layer "1" (solid, remove dead copper, pour order 24): -0.126,0.025 -0.126,74.981 cw(c-0.025,74.981) -0.096,75.052 -0.077,75.071 cw(c-0.006,75) -0.006,75.1 120,75.1 cw(c120,75) 120.1,75 cw(c120,75) 120.09,74.956 120.09,-0.051 cw(c119.99,-0.051) 119.99,-0.151 -0.025,-0.151 cw(c-0.025,-0.051) -0.118,-0.013 cw(c-0.025,0.025)
AGND on Bottom Layer "1" (solid, remove dead copper, pour order 20): 67.793,31.979 72.136,36.322 72.219,36.24 89.275,36.24 89.275,23.603 97.384,15.494 119.786,15.494 119.812,15.469 119.812,-0.051 67.793,-0.051
AGND on GND (split plane): 89.13,27.254 89.13,23.597 89.135,23.557 89.15,23.521 89.174,23.49 95.27,17.394 97.277,15.387 97.308,15.363 97.344,15.348 97.384,15.343 119.58,15.343 119.58,0.359 67.944,0.359 67.944,19.406 67.944,31.841 67.95,31.846 72.199,36.095 89.13,36.095
DGND on GND (split plane): 119.58,15.645 97.446,15.645 95.484,17.608 89.432,23.659 89.432,27.254 89.432,36.233 89.427,36.273 89.412,36.309 89.388,36.34 89.381,36.346 89.376,36.353 89.344,36.377 89.308,36.392 89.269,36.397 72.136,36.397 72.097,36.392 72.06,36.377 72.029,36.353 67.736,32.06 67.714,32.031 67.686,32.009 67.662,31.978 67.646,31.942 67.641,31.902 67.641,19.406 67.641,0.359 0.385,0.359 0.385,74.59 119.58,74.59

## Keep-outs
Keep-Out Layer:
  lines w0.2: -0.025,-0.051 119.99,-0.051 119.99,74.99 120,75 -0.006,75 -0.025,74.981 -0.025,0.025 0,0

## Other copper
Top Layer:
  text "Advchip" at 13.668,70.77 h2.54
GND (plane layer: these items are gaps in the copper):
  lines w0.15: 67.793,31.902 67.843,31.953 ; 89.269,36.246 89.281,36.233
  lines w0.3: 67.793,-0.33 67.793,19.406 67.793,31.902 ; 67.843,31.953 72.136,36.246 89.269,36.246 ; 89.281,36.233 89.281,27.254 89.281,23.597 95.377,17.501 97.384,15.494 116.688,15.494 119.939,15.494

## Silkscreen, mask and mechanical layers (free items; w line width, h text height)
Top Overlay:
  circle w0.3: c96.862,23.726 r2.5
  circle w0.762: c16.714,16.577 r0.381
  lines w0.15: 31.344,67.513 31.344,66.136 31.358,66.122 82.155,66.122 82.169,66.136 82.169,67.347 ; 31.344,72.422 31.344,74.287 31.383,74.326 82.158,74.326 82.169,74.315 82.169,72.422 ; 32.628,66.148 32.628,68.459 ; 44.247,2.852 44.247,1.417 44.261,1.403 95.058,1.403 95.072,1.417 95.072,2.857 ; 44.247,7.264 44.247,9.568 44.286,9.607 95.061,9.607 95.072,9.596 95.072,7.932 ; 45.328,66.173 45.328,68.154 ; 45.531,1.428 45.531,3.74 ; 54.243,66.224 54.243,74.326 ; 58.231,1.454 58.231,3.435 ; 59.374,66.224 59.374,74.326 ; 60.593,66.122 60.593,68.078 ; 67.121,1.403 67.121,9.506 ; 69.686,1.403 69.686,9.506 ; 70.741,66.148 70.741,68.51 ; 73.496,1.403 73.496,3.359 ; 80.67,24.95 84.277,24.95 ; 80.862,66.198 80.862,68.561 ; 83.644,1.428 83.644,3.791 ; 84.277,22.352 80.645,22.352 80.645,27.584 80.67,27.584 84.277,27.584 ; 93.765,1.479 93.765,3.841
  lines w0.152: 42.619,32.995 43,33.376 43.381,32.995 ; 42.645,28.651 43.026,28.27 43.407,28.651 ; 43.013,28.27 43.013,33.363
  lines w0.2: 44.393,21.103 54.813,21.103 54.813,25.421 44.393,25.421 44.393,18.69 ; 44.393,23.364 54.788,23.364 ; 48.092,18.694 48.092,25.421 ; 53.934,18.69 44.393,18.69 ; 54.813,21.383 54.813,18.69 44.393,18.69
  lines w0.254: 102.697,15.271 cw(c102.663,17.81) 103.943,15.616 ; 103.922,16.316 103.832,15.499 104.695,15.499
  lines w0.3: 95.516,25.784 98.361,21.796
  text "2" at 32.424,73.031 h0.9
  text "12" at 44.718,73.031 h0.9
  text "24" at 60.009,73.031 h0.9
  text "EPWM" at 63.692,73.031 h0.9
  text "32" at 70.093,73.031 h0.9
  text "EPWM" at 75.096,73.031 h0.9
  text "40" at 80.176,73.031 h0.9
  text "NC" at 56.109,72.949 h0.9
  text "NC" at 56.159,66.269 h0.9
  text "1" at 32.399,64.878 h0.9
  text "11" at 44.845,64.878 h0.9
  text "23" at 60.009,64.878 h0.9
  text "31" at 70.169,64.878 h0.9
  text "39" at 80.278,64.878 h0.9
  text "B" at 86.843,64.313 h1.5
  text "A" at 93.701,64.313 h1.5
  text "H" at 96.647,64.313 h1.5
  text "L" at 103.962,64.313 h1.5
  text "1" at 108.534,53.645 h3
  text "VIN" at 16.129,51.791 h1
  text "3V3" at 18.491,48.108 h1
  text "1V8" at 30.226,48.108 h1
  text "DGND" at 42.57,48.108 h1
  text "1" at 42.748,33.909 h1.2
  text "A3V3" at 78.588,28.93 h1
  text "0" at 42.596,26.543 h1.2
  text "BOOT" at 44.45,26.137 h1.5
  text "POT" at 81.128,25.806 h0.8
  text "1" at 33.96,24.232 h0.8
  text "2" at 36.538,24.232 h0.8
  text "3" at 39.116,24.232 h0.8
  text "1" at 46.72,23.923 h1
  text "GPIO18" at 49.209,23.897 h1
  text "2.5V" at 81.128,23.165 h0.8
  text "Pb" at 95.21,22.591 h2.54
  text "2" at 46.593,21.865 h1
  text "GPIO19" at 49.209,21.738 h1
  text "GPIO34" at 49.209,19.478 h1
  text "3" at 46.593,19.452 h1
  text "+" at 101.52,16.845 h2.54
  text "RESET" at 48.311,16.662 h1
  text "DISPLAY" at 18.619,15.79 h1.8
  text "AGND" at 85.319,12.09 h1
  text "AVP32F08_EVM_REV1.1" at 60.452,11.201 h1.5
  text "2" at 45.328,8.312 h0.9
  text "12" at 57.621,8.312 h0.9
  text "NC" at 67.716,8.312 h0.9
  text "24" at 72.912,8.312 h0.9
  text "ADC" at 77.23,8.312 h0.9
  text "32" at 82.996,8.312 h0.9
  text "ADC" at 87.746,8.312 h0.9
  text "40" at 93.08,8.312 h0.9
  text "NC" at 67.666,1.676 h0.9
  text "1" at 45.302,0.158 h0.9
  text "11" at 57.748,0.158 h0.9
  text "23" at 72.912,0.158 h0.9
  text "31" at 83.072,0.158 h0.9
  text "39" at 93.181,0.158 h0.9
Bottom Overlay:
  circle w0.2: c71.603,13.66 r1.25
  region: 73.81,56.899 37.844,56.899 37.844,51.996 73.81,51.996
  text "Read EVM User Guide before use." at 73.353,59.87 h1.52
  text "S/N" at 81.43,53.52 h2.54
  text "N" at 100.165,38.534 h5
  text "-0" at 88.633,31.702 h4
  text "94" at 95.187,31.702 h4
  text "R" at 103.645,31.702 h2
  text "V" at 90.227,31.657 h4
  text "Powered by" at 85.09,13.152 h1.52
  text "Advancechip Co.,LTD" at 69.571,12.949 h1.52
  text "C" at 72.136,12.949 h1.52
  text "2022/09/13" at 85.115,9.881 h1.5
Top Solder:
  rectangle: 13.287,69.424 26.978,74.123

## Text inside footprints (layer, text, board x,y; h text height)
CN5: Top Overlay "9" at 109.83,26.973 h1 r270; Top Overlay "5" at 107.112,26.353 h1 r270; Top Overlay "1" at 107.264,40.358 h1 r270; Top Overlay "6" at 109.652,40.069 h1 r270
DS7: Top Overlay "G4" at 35.317,1.861 h1.52 r90; Top Overlay "p" at 26.579,2.496 h1.52; Top Overlay "g" at 31.583,2.42 h1.52; Top Overlay "f" at 26.655,12.402 h1.52; Top Overlay "e" at 21.372,2.394 h1.52; Top Overlay "d" at 23.988,2.343 h1.52; Top Overlay "c" at 29.094,2.369 h1.52; Top Overlay "G3" at 32.497,11.995 h1.52 r90; Top Overlay "G2" at 29.932,12.021 h1.52 r90; Top Overlay "G1" at 22.286,12.097 h1.52 r90; Top Overlay "a" at 24.141,12.58 h1.52; Top Overlay "b" at 34.25,12.376 h1.52
SW1: Top Overlay "ON" at 34.442,32.385 h1.52